# Altium PCB SnakeCard_Native.PcbDoc (part 2 of 2)
Units mm, origin at the board's own origin, x right, y up, seen from the top; angles counter-clockwise.
Board outline 85.6 x 54 mm, 2 copper layers (F.Cu, B.Cu), stack 0.8 mm thick; 136 components, 39 nets, 370 pads, 189 vias.
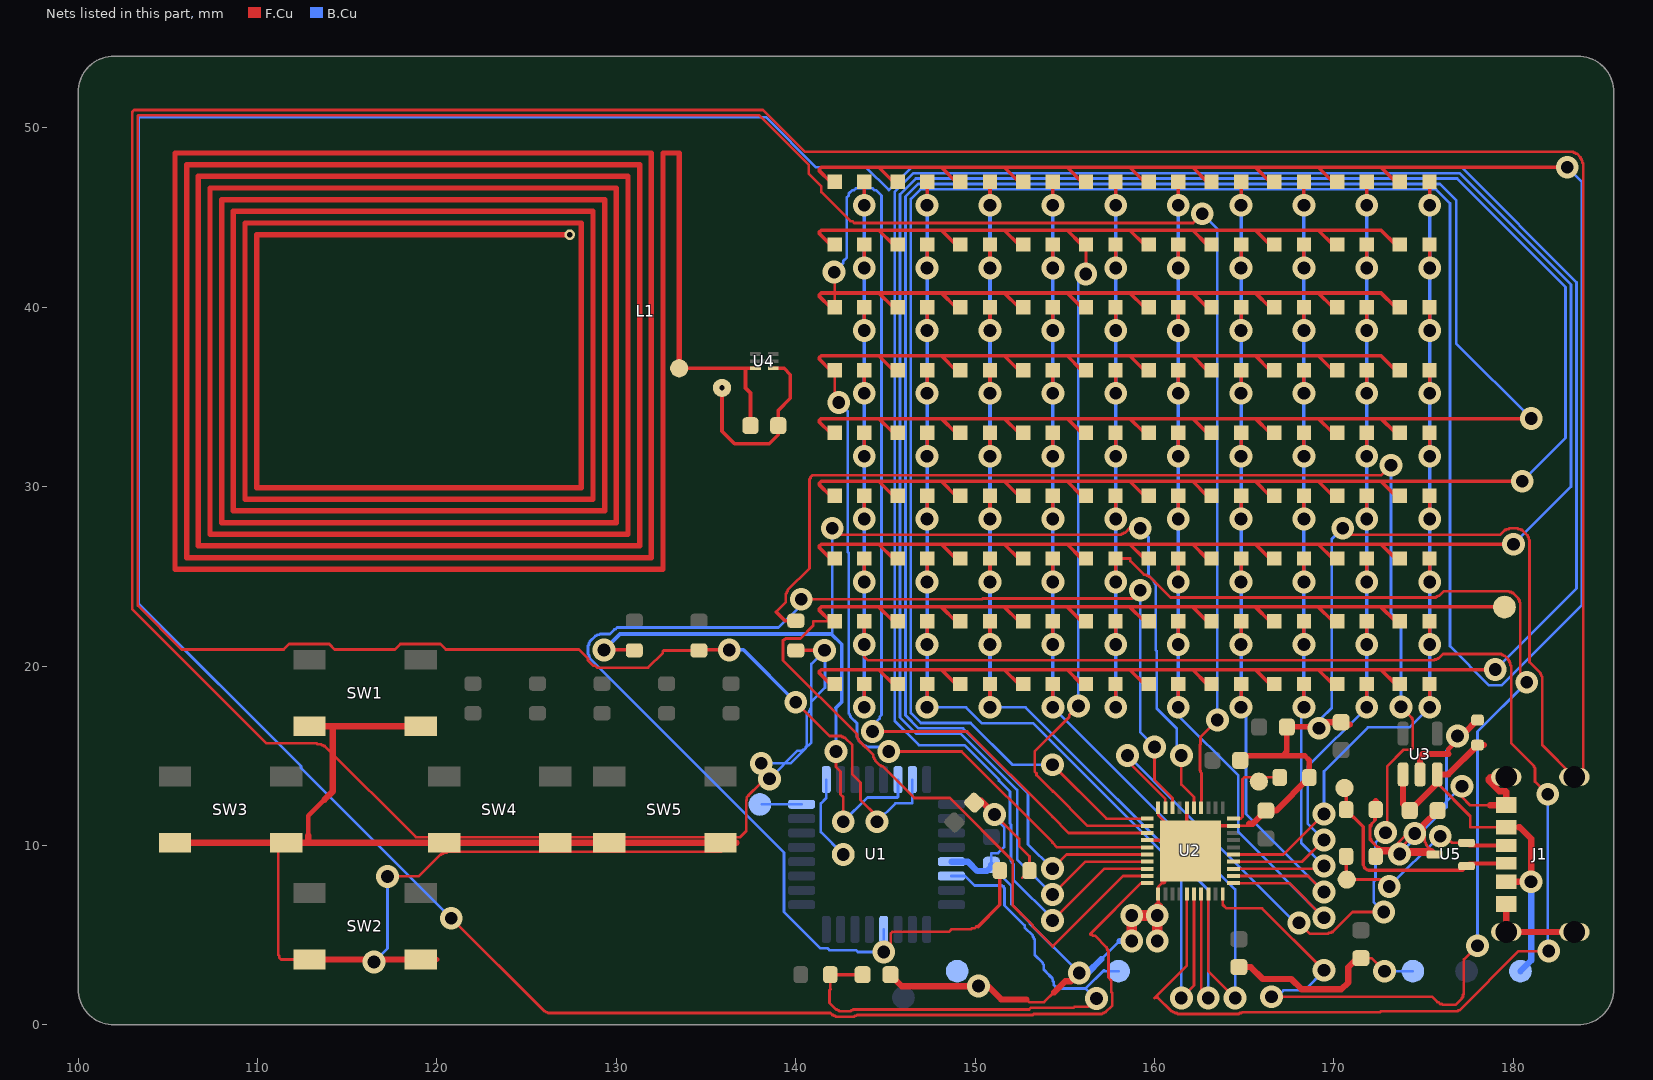
[diagram p2: the nets of this part, all layers, seen from the top]

## Via types
v1: diameter 1.27, hole 0.711, F.Cu to B.Cu, 189 vias

## Nets (pads, with @x,y where several pads share a name; then routed paths per layer and width w, separated by ;. In a path a pad name is that pad's centre, name@x,y a point inside that pad or via, vN(x,y) a via of type N, cw(c..) or ccw(c..) an arc to the next point about the centre after c; other vN are vias at no path point) (continued)
GND: C1.2 C2.2 C10.2 C11.2 C12.2 C20.2 C21.2 C22.2 C23.2 C24.2 D91.2 J1.A12 J1.B12 J1.S1 J1.S2 J1.S3 J1.S4 R1.2 R2.2 R22.2 R23.2 R24.2 SW1.2 SW2.2 SW3.2 SW4.2 SW5.2 TP3.1 TP5.1 U1.5 U2.4 U2.11 U2.29 U2.36 U2.40 U2.41 U3.2 U5.3 | length 459.1
  F.Cu w0.15: SW3.2@111.15,10.15 111.14,10.15 111.15,10.16 111.15,3.912 111.201,3.861 111.201,3.759 111.303,3.658 111.31,3.65 SW2.2@112.9,3.65 ; v1(116.484,3.505) 116.629,3.65 v1@116.62,3.65 ; v1(117.246,8.28) 118.974,8.28 120.193,9.5 120.244,9.5 120.294,9.55 120.345,9.55 120.396,9.601 120.548,9.601 120.599,9.652 SW5.2@135.839,9.652 ; v1(138.532,13.716) 138.532,13.513 138.481,13.513 138.43,13.462 138.354,13.462 138.328,13.437 137.998,13.437 137.363,12.802 137.363,12.776 137.262,12.675 137.262,12.522 137.236,12.497 137.236,10.795 136.906,10.465 118.821,10.465 113.741,15.545 113.69,15.545 113.64,15.596 113.589,15.596 113.538,15.646 113.335,15.646 113.284,15.697 110.49,15.697 103.022,23.165 103.022,50.902 103.124,51.003 138.176,51.003 140.513,48.666 183.337,48.666 183.388,48.616 183.439,48.616 183.49,48.565 183.54,48.565 183.744,48.362 183.744,48.311 183.794,48.26 183.794,48.209 183.845,48.158 183.845,48.057 183.896,48.006 183.896,14.326 J1.S4@183.388,13.818 ; v1(151.079,11.735) 152.451,10.363 152.451,9.982 153.035,9.398 153.025,9.388 R22.2@153.025,8.6 152.62,8.195 ; 152.857,1.422 153.01,1.27 153.848,1.27 154.407,1.829 ; U2.11@160.2,7.293 160.2,7.7 160.5,8 ; U2.40@160.2,12.108 160.2,11.7 160.5,11.4 160.7,11.2 U2.41@161.8,11.2 ; U2.41@162.762,11.043 U2.41@163.443,11.043 ; U2.41@163.5,11.043 U2.41@163.5,11.1 ; U2.29@164.408,11.1 165.16,11.1 165.277,11.218 ; v1(170.485,27.686) 170.84,27.33 179.273,27.33 179.527,27.584 179.578,27.584 179.629,27.635 179.73,27.635 179.781,27.686 180.238,27.686 180.289,27.635 180.391,27.635 180.442,27.584 180.492,27.584 180.797,27.28 180.797,27.229 180.848,27.178 180.848,27.076 180.899,27.026 180.899,20.218 181.508,19.609 181.508,19.558 181.559,19.507 181.559,19.456 181.61,19.406 181.61,15.596 J1.S4@183.388,13.818 ; C23.2@171.5,3.725 172.043,3.725 172.06,3.708 172.11,3.708 v1(172.822,2.997) ; R1.2@172.325,11.778 172.321,11.778 172.314,11.786 172.263,11.735 172.263,11.379 172.11,11.227 172.11,11.176 172.06,11.125 172.06,11.074 172.009,11.024 172.009,10.312 172.364,9.957 172.415,9.957 172.466,9.906 172.517,9.906 172.568,9.855 173.228,9.855 v1@173.33,9.957 ; R1.2@172.325,12 172.325,11.441 172.314,11.43 172.009,11.125 172.009,10.414 172.06,10.363 172.06,10.312 172.11,10.262 172.11,10.211 172.466,9.855 173.177,9.855 173.228,9.906 173.279,9.906 v1@173.33,9.957 ; v1(173.66,9.525) 173.634,9.5 U5.3@175.613,9.5 ; v1(174.498,10.668) 173.787,9.957 v1@173.33,9.957 ; 174.972,11.147 174.977,11.147 174.955,11.125 ; U5.3@175.436,9.676 175.412,9.652 175.412,9.703 175.362,9.754 175.362,9.804 175.158,10.008 175.158,10.058 175.108,10.109 175.108,10.16 175.057,10.211 175.057,10.922 174.955,11.024 174.955,11.125 ; v1(176.886,16.104) 176.987,16.205 177.241,16.205 177.221,16.226 v1@177.226,16.226 ; v1(177.14,13.31) 177.14,12.7 177.597,12.243 177.604,12.25 178.693,12.25 J1.A12@179.595,12.25 ; J1.S4@183.4,13.82 183.39,13.82 J1.S4@183.388,13.818 ; v1@173.33,9.957 173.38,9.957 174.498,11.074 174.549,11.074 174.6,11.125 174.955,11.125
  F.Cu w0.2: R23.2@140.004,20.879 v1(141.605,20.879) ; U2.4@159.593,10.3 U2.41@160.5,10.3 ; v1@160.2,6.55 U2.11@160.2,7.293 ; U2.41@161.8,11.2 U2.36@161.8,12.108 ; U2.41@163.5,11.1 U2.29@164.408,11.1
  F.Cu w0.262: 112.825,10.562 112.825,11.65 113.729,12.554 ; SW2.2@119.1,3.65 120,3.65 ; 176.376,15.1 176.376,15.376 v1@177.226,16.226
  F.Cu w0.3: C20.2@164.775,14.75 164.775,14.877 164.902,15.004 167.121,15.004 ; R24.2@168.625,13.8 168.625,14.75 168.371,15.004 167.121,15.004 ; v1(169.164,16.535) 169.088,16.612 167.481,16.612 167.375,16.506 167.375,16.4 167.375,15.258 167.121,15.004
  F.Cu w0.35: SW3.2@105.4,10.15 136.7,10.15 ; 112.825,10.15 112.825,10.562 ; SW2.2@112.9,3.65 SW2.2@119.1,3.65 ; SW1.2@112.9,16.65 SW1.2@119.1,16.65 ; 113.729,12.554 114.188,13.013 114.188,16.589 114.127,16.65 ; C12.2@145.275,2.8 145.911,2.164 v1(150.185,2.164) 150.19,2.159 150.368,2.159 150.393,2.134 150.749,2.134 151.46,1.422 152.857,1.422 ; C11.2@149.946,12.389 150.096,12.539 150.275,12.539 v1(151.079,11.735) ; 154.407,1.829 155.016,2.438 155.346,2.438 v1(155.804,2.896) ; 160.5,8 160.5,8.2 U2.41@162,9.7 161.8,9.9 U2.41@161.8,11.2 ; U2.41@160.5,10.3 U2.41@161.8,10.3 ; U2.41@161.8,11.043 U2.41@162.762,11.043 ; U2.41@163.443,11.043 U2.41@163.5,11.043 ; C22.2@164.7,3.225 165.354,3.225 166.019,2.56 167.615,2.56 168.194,1.981 170.409,1.981 170.79,2.362 170.79,3.217 171.298,3.725 C23.2@171.5,3.725 ; 165.277,11.218 165.468,11.218 C21.2@166.2,11.95 166.775,11.95 R24.2@168.625,13.8 ; C24.2@167.375,16.4 C24.2@167.375,16.6 ; v1(169.164,16.535) 169.189,16.535 169.529,16.875 C2.2@170.4,16.875 ; C2.2@170.218,16.693 C2.2@170.4,16.875 ; 170.875,16.741 170.534,16.741 C2.2@170.4,16.875 ; R2.2@172.325,9.4 172.6,9.676 175.437,9.676 U5.3@175.613,9.5 ; R1.2@172.325,11.778 172.325,12.475 ; U3.2@174.8,13.962 174.8,14.951 174.949,15.1 176.376,15.1 ; 174.972,11.147 C1.2@175.775,11.95 ; v1@177.226,16.226 D91.2@178,17 ; 178.693,12.25 J1.A12@179.595,12.25 179.595,13.001 179.57,13.027 179.217,13.027 178.623,13.62 178.623,13.72 178.723,13.82 J1.S2@179.6,13.82 ; J1.S1@179.595,5.185 J1.B12@179.595,6.75 ; J1.S1@179.6,5.18 J1.S3@183.4,5.18
  F.Cu w0.6: v1(158.725,4.674) v1(158.725,6.096) v1(160.147,6.096) ; v1(160.147,4.674) v1(160.147,6.096) ; v1@160.2,6.55 160.2,6.149 v1(160.147,6.096)
  B.Cu w0.15: v1(116.484,3.505) 117.246,4.267 v1(117.246,8.28) ; v1(138.074,14.58) 139.7,14.58 140.564,15.443 140.564,15.494 140.614,15.545 140.614,17.323 140.767,17.475 140.767,17.526 140.818,17.577 140.818,17.628 140.868,17.678 140.868,20.117 v1@141.63,20.879 ; v1(138.532,13.716) 140.106,15.291 140.36,15.291 140.411,15.342 140.462,15.342 140.868,15.748 140.868,18.034 141.63,18.796 v1@141.63,20.879 ; v1(141.605,20.879) v1@141.63,20.879 ; C10.2@150.9,8.825 150.89,8.825 150.901,8.814 150.952,8.814 152.019,7.747 152.019,6.731 153.035,5.715 153.035,5.69 153.06,5.664 153.06,5.639 v1(155.804,2.896) ; C10.2@150.9,8.925 150.9,9.574 150.901,9.576 151.282,9.576 151.613,9.906 151.613,11.024 151.587,11.049 151.587,11.074 151.079,11.582 v1(151.079,11.735) ; 157.023,3.658 158.039,4.674 ; v1(169.164,16.535) 169.266,16.637 169.266,17.069 169.875,17.678 169.875,27.076 v1(170.485,27.686) ; v1(172.822,2.997) TP3.1@174.396,2.997 ; v1(173.66,9.525) 176.276,12.141 176.276,15.291 176.886,15.9 v1(176.886,16.104) ; v1(174.498,10.668) v1(177.14,13.31)
  B.Cu w0.35: U1.5@148.675,9.1 149.6,9.1 150.125,8.575 150.65,8.575 150.9,8.825 C10.2@150.9,8.925 ; v1(155.804,2.896) 156.261,2.896 157.023,3.658 ; 158.039,4.674 v1(158.725,4.674)
I2C_SCL: R20.2 U1.30 U2.35 | length 70.6
  F.Cu w0.15: v1(142.037,27.686) 142.392,27.33 158.14,27.33 158.191,27.381 158.242,27.381 158.293,27.432 158.344,27.432 158.598,27.686 v1(159.207,27.686) ; v1(142.24,15.24) 142.24,14.376 142.494,14.122 142.494,12.852 142.646,12.7 v1(142.646,11.328) ; v1(161.493,15.011) 161.493,13.407 162.2,12.7 U2.35@162.2,12.108
  F.Cu w0.2: v1(129.311,20.904) 130.971,20.904 R20.2@131,20.875
  B.Cu w0.15: 141.981,21.791 141.984,21.791 142.037,21.844 v1(142.037,27.686) ; v1(142.24,15.24) 142.24,17.678 ; v1(142.646,11.328) 143.998,12.68 145.675,12.68 145.7,12.705 U1.30@145.7,13.675 ; v1(159.207,27.686) 159.207,27.635 159.664,27.178 159.664,25.044 159.969,24.74 159.969,24.689 160.02,24.638 160.02,24.587 160.071,24.536 160.071,20.879 160.122,20.828 160.122,17.628 161.239,16.51 161.239,15.291 161.493,15.037 161.468,15.011 v1(161.493,15.011)
  B.Cu w0.2: v1(129.311,20.904) 130.198,21.791 141.981,21.791 142.558,21.214 142.558,17.996 142.24,17.678
I2C_SDA: R21.2 U1.31 U2.34 | length 177
  F.Cu w0.15: R21.2@134.6,20.875 132.635,20.875 132.588,20.828 132.588,20.726 131.775,19.914 128.93,19.914 128.829,20.015 128.727,20.015 128.422,20.32 128.422,20.422 127.914,20.93 120.498,20.93 120.193,21.234 117.958,21.234 117.653,20.93 114.3,20.93 113.995,21.234 111.76,21.234 111.455,20.93 105.766,20.93 103.327,23.368 103.327,50.673 103.353,50.698 137.973,50.698 140.716,47.955 140.716,47.447 141.427,46.736 141.427,46.431 143.053,44.806 143.154,44.806 143.256,44.704 162.154,44.704 v1(162.662,45.212) ; v1(140.005,17.983) 141.884,16.104 142.545,16.104 142.596,16.053 142.646,16.053 142.697,16.002 142.748,16.002 143.154,15.596 143.154,13.97 143.612,13.513 143.612,12.548 144.526,11.633 v1(144.526,11.328) ; U2.34@162.6,12.108 162.6,12.75 ; 162.599,12.536 162.611,12.548 162.611,14.046 162.56,14.097 162.56,14.173 162.535,14.199 162.535,15.621 162.56,15.646 162.56,16.053 v1(163.5,16.993)
  F.Cu w0.2: R21.2@134.6,20.875 134.629,20.904 v1(136.296,20.904)
  B.Cu w0.15: v1(144.526,11.328) 145.548,12.35 146.475,12.35 146.5,12.375 U1.31@146.5,13.675 ; v1(162.662,45.212) 163.5,44.374 v1(163.5,16.993)
  B.Cu w0.2: v1(136.296,20.904) 137.084,20.904 v1(140.005,17.983)
LED_COL1: D1.2 D11.2 D21.2 D31.2 D41.2 D51.2 D61.2 D71.2 D81.2 U2.15 | length 125.5
  F.Cu w0.15: D71.2@143.825,22.5 143.825,20.533 143.815,20.523 144.018,20.32 175.565,20.32 175.616,20.371 175.717,20.371 175.768,20.422 175.819,20.422 176.073,20.676 179.324,20.676 179.375,20.625 179.426,20.625 179.476,20.574 179.527,20.574 179.73,20.371 179.73,20.32 179.781,20.269 179.781,20.218 179.832,20.168 179.832,20.066 179.883,20.015 179.883,15.697 181.153,14.427 181.153,14.376 181.204,14.326 181.204,13.564 v1(181.915,12.852) ; U2.15@161.8,7.293 161.8,3.304 159.995,1.499 160.02,1.524 160.172,1.524 160.934,0.762 160.985,0.762 161.036,0.711 161.087,0.711 161.138,0.66 161.239,0.66 161.29,0.61 164.694,0.61 164.744,0.66 164.846,0.66 164.897,0.711 172.568,0.711 172.618,0.762 176.886,0.762 176.936,0.813 176.987,0.813 180.289,4.115 v1(181.966,4.115)
  F.Cu w0.2: v1(143.815,17.704) 143.815,18.99 D81.2@143.825,19 ; v1(143.815,21.209) 143.815,22.49 D71.2@143.825,22.5 ; v1(143.815,24.689) 143.815,25.99 D61.2@143.825,26 ; v1(143.815,28.194) 143.815,29.49 D51.2@143.825,29.5 ; v1(143.815,31.699) 143.815,32.99 D41.2@143.825,33 ; v1(143.815,35.204) 143.815,36.49 D31.2@143.825,36.5 ; v1(143.815,38.71) 143.815,39.99 D21.2@143.825,40 ; v1(143.815,42.189) 143.815,43.49 D11.2@143.825,43.5 ; v1(143.815,45.695) 143.815,46.99 D1.2@143.825,47
  B.Cu w0.15: v1(181.915,12.852) 181.915,4.166 v1(181.966,4.115)
  B.Cu w0.2: v1(143.815,17.704) v1(143.815,45.695)
LED_COL2: D2.2 D12.2 D22.2 D32.2 D42.2 D52.2 D62.2 D72.2 D82.2 U2.16 | length 70.8
  F.Cu w0.15: v1(161.493,1.499) 162.2,2.205 U2.16@162.2,7.293
  F.Cu w0.2: v1(147.32,17.704) D82.2@147.32,18.995 ; v1(147.32,21.209) D72.2@147.32,22.495 ; v1(147.32,24.689) D62.2@147.32,25.995 ; v1(147.32,28.194) D52.2@147.32,29.495 ; v1(147.32,31.699) D42.2@147.32,32.995 ; v1(147.32,35.204) D32.2@147.32,36.495 ; v1(147.32,38.71) D22.2@147.32,39.995 ; v1(147.32,42.189) D12.2@147.32,43.495 ; v1(147.32,45.695) D2.2@147.32,46.995
  B.Cu w0.15: v1(147.32,17.704) 149.489,17.704 150.384,16.809 153.243,16.809 161.493,8.559 v1(161.493,1.499)
  B.Cu w0.2: v1(147.32,17.704) v1(147.32,45.695)
LED_COL3: D3.2 D13.2 D23.2 D33.2 D43.2 D53.2 D63.2 D73.2 D83.2 U2.17 | length 68.1
  F.Cu w0.15: U2.17@162.6,7.293 162.6,1.89 v1(162.992,1.499)
  F.Cu w0.2: v1(150.825,17.704) D83.2@150.825,19 ; v1(150.825,21.209) D73.2@150.825,22.5 ; v1(150.825,24.689) D63.2@150.825,26 ; v1(150.825,28.194) D53.2@150.825,29.5 ; v1(150.825,31.699) D43.2@150.825,33 ; v1(150.825,35.204) D33.2@150.825,36.5 ; v1(150.825,38.71) D23.2@150.825,40 ; v1(150.825,42.189) D13.2@150.825,43.5 ; v1(150.825,45.695) D3.2@150.825,47
  B.Cu w0.15: v1(150.825,17.704) 152.812,17.704 162.992,7.524 v1(162.992,1.499)
  B.Cu w0.2: v1(150.825,17.704) v1(150.825,45.695)
LED_COL4: D4.2 D14.2 D24.2 D34.2 D44.2 D54.2 D64.2 D74.2 D84.2 U2.18 | length 66.5
  F.Cu w0.15: U2.18@163,7.293 163,2.989 v1(164.49,1.499)
  F.Cu w0.2: v1(154.33,17.704) D84.2@154.33,18.995 ; v1(154.33,21.209) D74.2@154.33,22.495 ; v1(154.33,24.689) D64.2@154.33,25.995 ; v1(154.33,28.194) D54.2@154.33,29.495 ; v1(154.33,31.699) D44.2@154.33,32.995 ; v1(154.33,35.204) D34.2@154.33,36.495 ; v1(154.33,38.71) D24.2@154.33,39.995 ; v1(154.33,42.189) D14.2@154.33,43.495 ; v1(154.33,45.695) D4.2@154.33,46.995
  B.Cu w0.15: v1(154.33,17.704) 164.49,7.544 v1(164.49,1.499)
  B.Cu w0.2: v1(154.33,17.704) v1(154.33,45.695)
LED_COL5: D5.2 D15.2 D25.2 D35.2 D45.2 D55.2 D65.2 D75.2 D85.2 U2.20 | length 109.8
  F.Cu w0.15: D65.2@157.825,26 158.639,26 158.648,26.01 158.648,25.857 159.41,25.095 159.512,25.095 159.563,25.044 159.614,25.044 159.664,24.994 159.715,24.994 160.884,23.825 175.666,23.825 175.717,23.876 175.768,23.876 175.819,23.927 175.87,23.927 176.124,24.181 179.73,24.181 179.781,24.13 179.883,24.13 179.934,24.079 179.984,24.079 180.289,23.774 180.289,23.724 180.34,23.673 180.34,23.571 180.391,23.52 180.391,19.456 v1(180.746,19.101) ; U2.20@163.8,7.293 163.8,6.7 164,6.5 165.991,6.5 v1(169.443,3.048) ; v1(166.522,1.575) 175.463,1.575 175.768,1.27 175.819,1.27 175.92,1.168 176.022,1.168 176.073,1.118 176.784,1.118 177.14,1.473 177.14,1.524 177.19,1.575 177.19,1.676 177.241,1.727 177.241,3.658 v1(178.003,4.42)
  F.Cu w0.2: D85.2@157.825,19 157.836,18.989 v1(157.836,17.704) ; D75.2@157.825,22.5 157.836,22.489 v1(157.836,21.209) ; D65.2@157.825,26 157.836,25.989 v1(157.836,24.689) ; D55.2@157.825,29.5 157.836,29.489 v1(157.836,28.194) ; D45.2@157.825,33 157.836,32.989 v1(157.836,31.699) ; D35.2@157.825,36.5 157.836,36.489 v1(157.836,35.204) ; D25.2@157.825,40 157.836,39.989 v1(157.836,38.71) ; D15.2@157.825,43.5 157.836,43.489 v1(157.836,42.189) ; D5.2@157.825,47 157.836,46.989 v1(157.836,45.695)
  B.Cu w0.15: v1(166.522,1.575) 166.573,1.626 166.878,1.626 167.183,1.93 168.351,1.93 169.469,3.048 v1(169.443,3.048) ; v1(178.003,4.42) 178.003,16.358 v1(180.746,19.101)
  B.Cu w0.2: v1(157.836,17.704) v1(157.836,45.695)
LED_COL6: D6.2 D16.2 D26.2 D36.2 D46.2 D56.2 D66.2 D76.2 D86.2 U2.21 | length 60.7
  F.Cu w0.15: U2.21@164.408,7.9 167.512,7.9 v1(169.443,5.969)
  F.Cu w0.2: v1(161.315,17.704) 161.315,18.99 D86.2@161.325,19 ; v1(161.315,21.209) 161.315,22.49 D76.2@161.325,22.5 ; v1(161.315,24.689) 161.315,25.99 D66.2@161.325,26 ; v1(161.315,28.194) 161.315,29.49 D56.2@161.325,29.5 ; v1(161.315,31.699) 161.315,32.99 D46.2@161.325,33 ; v1(161.315,35.204) 161.315,36.49 D36.2@161.325,36.5 ; v1(161.315,38.71) 161.315,39.99 D26.2@161.325,40 ; v1(161.315,42.189) 161.315,43.49 D16.2@161.325,43.5 ; v1(161.315,45.695) 161.315,46.99 D6.2@161.325,47
  B.Cu w0.15: v1(161.315,17.704) 161.315,17.247 164.671,13.892 164.671,10.742 v1(169.443,5.969)
  B.Cu w0.2: v1(161.315,17.704) v1(161.315,45.695)
LED_COL7: D7.2 D17.2 D27.2 D37.2 D47.2 D57.2 D67.2 D77.2 D87.2 U2.22 | length 57.3
  F.Cu w0.15: U2.22@164.408,8.3 168.56,8.3 v1(169.443,7.417)
  F.Cu w0.2: v1(164.821,17.704) D87.2@164.821,18.996 ; v1(164.821,21.209) D77.2@164.821,22.496 ; v1(164.821,24.689) D67.2@164.821,25.996 ; v1(164.821,28.194) D57.2@164.821,29.496 ; v1(164.821,31.699) D47.2@164.821,32.996 ; v1(164.821,35.204) D37.2@164.821,36.496 ; v1(164.821,38.71) D27.2@164.821,39.996 ; v1(164.821,42.189) D17.2@164.821,43.496 ; v1(164.821,45.695) D7.2@164.821,46.996
  B.Cu w0.15: v1(164.821,17.704) 165.097,17.427 165.097,11.763 v1(169.443,7.417)
  B.Cu w0.2: v1(164.821,17.704) v1(164.821,45.695)
LED_COL8: D8.2 D18.2 D28.2 D38.2 D48.2 D58.2 D68.2 D78.2 D88.2 U2.23 | length 54.2
  F.Cu w0.15: U2.23@164.408,8.7 169.279,8.7 v1(169.443,8.865)
  F.Cu w0.2: v1(168.326,17.704) D88.2@168.325,19 ; v1(168.326,21.209) D78.2@168.325,22.5 ; v1(168.326,24.689) D68.2@168.325,26 ; v1(168.326,28.194) D58.2@168.325,29.5 ; v1(168.326,31.699) D48.2@168.325,33 ; v1(168.326,35.204) D38.2@168.325,36.5 ; v1(168.326,38.71) D28.2@168.325,40 ; v1(168.326,42.189) D18.2@168.325,43.5 ; v1(168.326,45.695) D8.2@168.325,47
  B.Cu w0.15: v1(168.326,17.704) 168.175,17.553 168.175,10.133 v1(169.443,8.865)
  B.Cu w0.2: v1(168.326,17.704) v1(168.326,45.695)
LED_COL9: D9.2 D19.2 D29.2 D39.2 D49.2 D59.2 D69.2 D79.2 D89.2 U2.24 | length 54.3
  F.Cu w0.15: U2.24@164.408,9.1 168.231,9.1 v1(169.443,10.312)
  F.Cu w0.2: v1(171.831,17.704) D89.2@171.831,18.994 ; v1(171.831,21.209) D79.2@171.831,22.494 ; v1(171.831,24.689) D69.2@171.831,25.994 ; v1(171.831,28.194) D59.2@171.831,29.494 ; v1(171.831,31.699) D49.2@171.831,32.994 ; v1(171.831,35.204) D39.2@171.831,36.494 ; v1(171.831,38.71) D29.2@171.831,39.994 ; v1(171.831,42.189) D19.2@171.831,43.494 ; v1(171.831,45.695) D9.2@171.831,46.994
  B.Cu w0.15: v1(169.443,10.312) 168.536,11.22 168.536,14.409 v1(171.831,17.704)
  B.Cu w0.2: v1(171.831,17.704) v1(171.831,45.695)
LED_COL10: D10.2 D20.2 D30.2 D40.2 D50.2 D60.2 D70.2 D80.2 D90.2 U2.25 | length 55.5
  F.Cu w0.15: U2.25@164.408,9.5 167.183,9.5 v1(169.443,11.76)
  F.Cu w0.2: D90.2@175.325,19 175.336,18.989 v1(175.336,17.704) ; D80.2@175.325,22.5 175.336,22.489 v1(175.336,21.209) ; D70.2@175.325,26 175.336,25.989 v1(175.336,24.689) ; D60.2@175.325,29.5 175.336,29.489 v1(175.336,28.194) ; D50.2@175.325,33 175.336,32.989 v1(175.336,31.699) ; D40.2@175.325,36.5 175.336,36.489 v1(175.336,35.204) ; D30.2@175.325,40 175.336,39.989 v1(175.336,38.71) ; D20.2@175.325,43.5 175.336,43.489 v1(175.336,42.189) ; D10.2@175.325,47 175.336,46.989 v1(175.336,45.695)
  B.Cu w0.15: v1(169.443,11.76) 169.443,14.133 171.895,16.585 174.218,16.585 v1(175.336,17.704)
  B.Cu w0.2: v1(175.336,17.704) v1(175.336,45.695)
LED_EN: R22.1 U1.12 U2.38 | length 83.6
  F.Cu w0.15: v1(140.31,23.724) 150.368,23.724 150.419,23.774 158.75,23.774 v1(159.207,24.232) ; v1(144.907,4.064) 145.3,4.457 145.3,5.1 145.4,5.2 148.558,5.2 148.692,5.334 149.758,5.334 149.809,5.385 149.962,5.385 150.063,5.486 150.165,5.486 ; v1(159.995,15.494) 159.995,13.655 161,12.65 U2.38@161,12.108
  F.Cu w0.2: 150.165,5.486 151.375,6.697 R22.1@151.375,8.6
  B.Cu w0.15: v1(140.31,23.724) 140.31,23.419 139.04,22.149 130.048,22.149 129.946,22.047 129.896,22.047 129.642,21.793 129.083,21.793 129.032,21.742 128.93,21.742 128.88,21.692 128.829,21.692 128.524,21.387 128.524,21.336 128.473,21.285 128.473,21.184 128.422,21.133 128.422,20.676 128.473,20.625 128.473,20.523 128.524,20.472 128.524,20.422 139.344,9.601 139.344,6.299 141.376,4.267 141.783,4.267 141.884,4.166 143.358,4.166 143.459,4.064 v1@144.882,4.064 ; v1@144.882,4.115 v1@145.034,4.267 ; v1@144.889,4.071 144.9,4.071 U1.12@144.9,5.325 v1@144.9,4.133 ; v1(159.207,24.232) 159.207,16.307 160.02,15.494 v1(159.995,15.494)
LED_IICRST: R23.1 U2.39 | length 91.8
  F.Cu w0.15: 138.913,23.012 138.887,23.012 139.446,23.571 139.446,24.028 139.497,24.079 139.497,24.13 139.548,24.181 139.548,24.232 140.767,25.451 140.767,30.429 140.818,30.48 140.818,30.531 140.919,30.632 172.618,30.632 v1(173.177,31.191) ; v1(158.496,15.011) 158.496,14.704 160.6,12.6 U2.39@160.6,12.108 ; v1(168.046,5.69) 168.656,5.08 169.672,5.08 169.723,5.131 169.824,5.131 169.875,5.182 169.926,5.182 171.044,6.299 v1(172.771,6.299) ; v1(172.872,10.719) 172.872,11.278 172.974,11.379 172.974,14.427 173.888,15.342 174.295,15.342 174.396,15.443 174.396,17.018 174.346,17.069 174.346,17.12 v1(173.736,17.729)
  F.Cu w0.2: 138.913,23.012 139.4,22.525 R23.1@140,22.525
  B.Cu w0.15: v1(158.496,15.011) 158.471,15.011 158.496,15.037 167.843,5.69 v1(168.046,5.69) ; v1(172.771,6.299) 172.212,6.858 172.212,8.026 172.263,8.026 172.263,8.128 172.314,8.128 172.314,10.16 v1(172.872,10.719) ; v1(173.177,31.191) 173.177,22.962 173.736,22.403 v1(173.736,17.729)
LED_R_EXT: pad.RN01 R24.1 U2.30 | length 5
  F.Cu w0.15: U2.30@164.408,11.5 164.8,11.5 164.9,11.6 164.9,13.7 165,13.8 R24.1@166.975,13.8 ; pad.RN01@165.811,13.564 pad.RN01@165.811,13.8
LED_ROW1: D1.1 D2.1 D3.1 D4.1 D5.1 D6.1 D7.1 D8.1 D9.1 D10.1 U2.1 | length 189.8
  F.Cu w0.15: v1(154.305,14.503) 157.308,11.5 U2.1@159.593,11.5
  F.Cu w0.2: D1.1@142.175,47 141.925,47 141.325,47.6 141.325,47.7 141.425,47.8 v1@183.004,47.8 ; 144.625,47.8 145.425,47 D2.1@145.675,47 ; 148.125,47.8 148.925,47 D3.1@149.175,47 ; 151.625,47.8 152.425,47 D4.1@152.675,47 ; 155.125,47.8 155.925,47 D5.1@156.175,47 ; 158.625,47.8 159.425,47 D6.1@159.675,47 ; 162.125,47.8 162.925,47 D7.1@163.175,47 ; 165.625,47.8 166.425,47 D8.1@166.675,47 ; 169.125,47.8 169.925,47 D9.1@170.175,47 ; 172.625,47.8 173.425,47 D10.1@173.675,47
  B.Cu w0.15: v1(154.305,14.503) 152.075,14.503 149.746,16.832 146.971,16.832 146.416,17.387 146.416,46.049 146.942,46.575 175.689,46.575 176.465,45.799 176.465,21.113 178.65,18.929 179.346,18.929 183.82,23.403 183.82,46.99 v1(183.007,47.803)
LED_ROW2: D11.1 D12.1 D13.1 D14.1 D15.1 D16.1 D17.1 D18.1 D19.1 D20.1 U2.2 | length 83.2
  F.Cu w0.15: 154.305,13.056 156.261,11.1 U2.2@159.593,11.1 ; 154.33,13.005 153.416,13.919 153.416,14.021 153.314,14.122 153.314,15.24 155.245,17.17 155.245,17.272 v1(155.753,17.78) ; v1(156.159,41.859) 156.175,41.875 D15.1@156.175,43.5
  F.Cu w0.2: D11.1@142.175,43.5 141.925,43.5 141.325,44.1 141.325,44.2 141.425,44.3 172.625,44.3 173.425,43.5 D20.1@173.675,43.5 ; 144.625,44.3 145.425,43.5 D12.1@145.675,43.5 ; 148.125,44.3 148.925,43.5 D13.1@149.175,43.5 ; 151.625,44.3 152.425,43.5 D14.1@152.675,43.5 ; 155.125,44.3 155.925,43.5 D15.1@156.175,43.5 ; 158.625,44.3 159.425,43.5 D16.1@159.675,43.5 ; 162.125,44.3 162.925,43.5 D17.1@163.175,43.5 ; 165.625,44.3 166.425,43.5 D18.1@166.675,43.5 ; 169.125,44.3 169.925,43.5 D19.1@170.175,43.5
  B.Cu w0.15: v1(155.753,17.78) 155.753,41.453 v1(156.159,41.859)
LED_ROW3: D21.1 D22.1 D23.1 D24.1 D25.1 D26.1 D27.1 D28.1 D29.1 D30.1 U2.3 | length 101.6
  F.Cu w0.15: v1(142.138,41.961) 142.175,41.924 D21.1@142.175,40 ; v1(144.272,16.358) 149.555,16.358 154.33,11.582 ; 154.305,11.608 155.213,10.7 U2.3@159.593,10.7
  F.Cu w0.2: D21.1@142.175,40 141.925,40 141.325,40.6 141.325,40.7 141.425,40.8 172.625,40.8 173.425,40 D30.1@173.675,40 ; 144.625,40.8 145.425,40 D22.1@145.675,40 ; 148.125,40.8 148.925,40 D23.1@149.175,40 ; 151.625,40.8 152.425,40 D24.1@152.675,40 ; 155.125,40.8 155.925,40 D25.1@156.175,40 ; 158.625,40.8 159.425,40 D26.1@159.675,40 ; 162.125,40.8 162.925,40 D27.1@163.175,40 ; 165.625,40.8 166.425,40 D28.1@166.675,40 ; 169.125,40.8 169.925,40 D29.1@170.175,40
  B.Cu w0.15: v1(142.138,41.961) 142.646,42.469 142.646,42.57 142.85,42.774 142.85,46.126 142.951,46.228 142.951,46.33 143.154,46.533 143.256,46.533 143.358,46.634 144.272,46.634 144.374,46.533 144.475,46.533 144.78,46.228 144.78,17.272 144.678,17.17 144.678,17.069 144.272,16.662 v1(144.272,16.358)
LED_ROW4: D31.1 D32.1 D33.1 D34.1 D35.1 D36.1 D37.1 D38.1 D39.1 D40.1 U2.5 | length 85.2
  F.Cu w0.15: D31.1@142.175,36.5 142.175,34.507 142.189,34.493 v1(142.392,34.696) ; v1(145.186,15.24) 149.25,15.24 154.33,10.16 154.305,10.16 154.565,9.9 U2.5@159.593,9.9
  F.Cu w0.2: D31.1@142.175,36.5 141.925,36.5 141.325,37.1 141.325,37.2 141.425,37.3 172.625,37.3 173.425,36.5 D40.1@173.675,36.5 ; 144.625,37.3 145.425,36.5 D32.1@145.675,36.5 ; 148.125,37.3 148.925,36.5 D33.1@149.175,36.5 ; 151.625,37.3 152.425,36.5 D34.1@152.675,36.5 ; 155.125,37.3 155.925,36.5 D35.1@156.175,36.5 ; 158.625,37.3 159.425,36.5 D36.1@159.675,36.5 ; 162.125,37.3 162.925,36.5 D37.1@163.175,36.5 ; 165.625,37.3 166.425,36.5 D38.1@166.675,36.5 ; 169.125,37.3 169.925,36.5 D39.1@170.175,36.5
  B.Cu w0.15: v1(142.392,34.696) 142.9,34.188 142.9,26.365 142.951,26.314 142.951,17.374 143.002,17.323 143.002,17.272 143.053,17.221 143.053,17.17 143.408,16.815 143.408,16.053 143.459,16.002 143.459,15.951 143.51,15.9 143.51,15.85 143.764,15.596 143.815,15.596 143.866,15.545 143.916,15.545 143.967,15.494 144.932,15.494 v1(145.186,15.24)
LED_ROW5: D41.1 D42.1 D43.1 D44.1 D45.1 D46.1 D47.1 D48.1 D49.1 D50.1 U2.6 | length 146.5
  F.Cu w0.15: v1(154.305,8.712) 155.093,9.5 U2.6@159.593,9.5
  F.Cu w0.2: D41.1@142.175,33 141.925,33 141.325,33.6 141.325,33.7 141.425,33.8 180.993,33.8 v1(181,33.807) ; 144.625,33.8 145.425,33 D42.1@145.675,33 ; 148.125,33.8 148.925,33 D43.1@149.175,33 ; 151.625,33.8 152.425,33 D44.1@152.675,33 ; 155.125,33.8 155.925,33 D45.1@156.175,33 ; 158.625,33.8 159.425,33 D46.1@159.675,33 ; 162.125,33.8 162.925,33 D47.1@163.175,33 ; 165.625,33.8 166.425,33 D48.1@166.675,33 ; 169.125,33.8 169.925,33 D49.1@170.175,33 ; 172.625,33.8 173.425,33 D50.1@173.675,33
  B.Cu w0.15: v1(154.305,8.712) 152.948,10.069 152.948,12.911 149.329,16.531 146.846,16.531 146.114,17.262 146.114,46.174 146.817,46.877 175.91,46.877 176.813,45.975 176.813,37.995 v1(181,33.807)
LED_ROW6: D51.1 D52.1 D53.1 D54.1 D55.1 D56.1 D57.1 D58.1 D59.1 D60.1 U2.7 | length 154.7
  F.Cu w0.15: v1(154.305,7.264) 156.141,9.1 U2.7@159.593,9.1
  F.Cu w0.2: D51.1@142.175,29.5 141.925,29.5 141.325,30.1 141.325,30.2 141.425,30.3 v1@180.49,30.3 ; 144.625,30.3 145.425,29.5 D52.1@145.675,29.5 ; 148.125,30.3 148.925,29.5 D53.1@149.175,29.5 ; 151.625,30.3 152.425,29.5 D54.1@152.675,29.5 ; 155.125,30.3 155.925,29.5 D55.1@156.175,29.5 ; 158.625,30.3 159.425,29.5 D56.1@159.675,29.5 ; 162.125,30.3 162.925,29.5 D57.1@163.175,29.5 ; 165.625,30.3 166.425,29.5 D58.1@166.675,29.5 ; 169.125,30.3 169.925,29.5 D59.1@170.175,29.5 ; 172.625,30.3 173.425,29.5 D60.1@173.675,29.5
  B.Cu w0.15: v1(154.305,7.264) 152.339,9.231 152.339,13.094 149.204,16.229 146.721,16.229 145.813,17.137 145.813,46.299 146.692,47.179 176.864,47.179 182.905,41.137 182.905,32.715 v1(180.492,30.302)
LED_ROW7: D61.1 D62.1 D63.1 D64.1 D65.1 D66.1 D67.1 D68.1 D69.1 D70.1 U2.8 | length 161.2
  F.Cu w0.15: v1(154.305,5.817) 157.188,8.7 U2.8@159.593,8.7
  F.Cu w0.2: D61.1@142.175,26 141.925,26 141.325,26.6 141.325,26.7 141.425,26.8 v1@180.007,26.8 ; 144.625,26.8 145.425,26 D62.1@145.675,26 ; 148.125,26.8 148.925,26 D63.1@149.175,26 ; 151.625,26.8 152.425,26 D64.1@152.675,26 ; 155.125,26.8 155.925,26 D65.1@156.175,26 ; 158.625,26.8 159.425,26 D66.1@159.675,26 ; 162.125,26.8 162.925,26 D67.1@163.175,26 ; 165.625,26.8 166.425,26 D68.1@166.675,26 ; 169.125,26.8 169.925,26 D69.1@170.175,26 ; 172.625,26.8 173.425,26 D70.1@173.675,26
  B.Cu w0.15: 151.345,13.653 149.403,15.595 146.87,15.595 145.511,16.954 145.511,46.424 146.567,47.48 177.006,47.48 183.217,41.27 183.217,30.004 v1(180.01,26.797) ; 151.345,13.653 151.333,13.665 151.333,13.614 151.943,13.005 151.943,11.227 151.994,11.176 151.994,9.144 152.044,9.093 152.044,9.042 152.146,8.941 152.146,8.077 154.33,5.893 154.33,5.791 v1(154.305,5.817)
LED_ROW8: D71.1 D72.1 D73.1 D74.1 D75.1 D76.1 D77.1 D78.1 D79.1 D80.1 pad.RN04 U2.9 | length 86.8
  F.Cu w0.15: D71.1@142.175,22.5 140.974,22.5 140.97,22.504 140.97,22.25 140.259,21.539 139.446,21.539 139.395,21.488 139.344,21.488 139.294,21.438 139.294,20.32 143.408,16.205 143.408,16.053 143.459,16.002 143.459,15.951 143.51,15.9 143.51,15.85 144.323,15.037 144.323,14.935 144.374,14.884 144.374,14.834 144.424,14.783 144.424,14.732 144.678,14.478 144.729,14.478 144.78,14.427 144.831,14.427 146.609,12.649 148.59,12.649 152.095,9.144 152.095,6.655 153.213,5.537 153.213,5.486 154.33,4.369 154.305,4.369 158.236,8.3 U2.9@159.593,8.3
  F.Cu w0.2: D71.1@142.175,22.5 141.925,22.5 141.325,23.1 141.325,23.2 141.425,23.3 179.494,23.3 pad.RN04@179.502,23.292 ; 144.625,23.3 145.425,22.5 D72.1@145.675,22.5 ; 148.125,23.3 148.925,22.5 D73.1@149.175,22.5 ; 151.625,23.3 152.425,22.5 D74.1@152.675,22.5 ; 155.125,23.3 155.925,22.5 D75.1@156.175,22.5 ; 158.625,23.3 159.425,22.5 D76.1@159.675,22.5 ; 162.125,23.3 162.925,22.5 D77.1@163.175,22.5 ; 165.625,23.3 166.425,22.5 D78.1@166.675,22.5 ; 169.125,23.3 169.925,22.5 D79.1@170.175,22.5 ; 172.625,23.3 173.425,22.5 D80.1@173.675,22.5
LED_ROW9: D81.1 D82.1 D83.1 D84.1 D85.1 D86.1 D87.1 D88.1 D89.1 D90.1 U2.10 | length 260
  F.Cu w0.15: v1(120.802,5.944) 125.984,0.762 126.035,0.762 126.086,0.711 126.136,0.711 126.187,0.66 141.935,0.66 142.037,0.559 142.088,0.559 142.138,0.508 142.189,0.508 142.24,0.457 143.256,0.457 143.307,0.508 143.358,0.508 143.408,0.559 153.213,0.559 153.264,0.61 157.074,0.61 157.124,0.66 157.175,0.66 157.226,0.711 157.277,0.711 157.632,1.067 157.632,1.778 157.582,1.829 157.582,2.489 157.429,2.642 157.429,4.115 157.378,4.166 157.378,4.216 157.328,4.267 157.328,4.318 156.667,4.978 156.566,4.978 156.515,5.029 156.439,5.029 156.413,5.055 156.413,5.08 159.233,7.9 U2.10@159.593,7.9
  F.Cu w0.2: D81.1@142.175,19 141.925,19 141.325,19.6 141.325,19.7 141.425,19.8 178.982,19.8 v1(178.994,19.812) ; 144.625,19.8 145.425,19 D82.1@145.675,19 ; 148.125,19.8 148.925,19 D83.1@149.175,19 ; 151.625,19.8 152.425,19 D84.1@152.675,19 ; 155.125,19.8 155.925,19 D85.1@156.175,19 ; 158.625,19.8 159.425,19 D86.1@159.675,19 ; 162.125,19.8 162.925,19 D87.1@163.175,19 ; 165.625,19.8 166.425,19 D88.1@166.675,19 ; 169.125,19.8 169.925,19 D89.1@170.175,19 ; 172.625,19.8 173.425,19 D90.1@173.675,19
  B.Cu w0.15: v1(120.802,5.944) 112.42,14.326 112.42,14.427 103.378,23.47 103.378,50.546 103.429,50.597 138.328,50.597 141.122,47.803 143.916,47.803 145.186,46.533 145.203,46.549 145.209,46.549 146.442,47.782 177.131,47.782 183.518,41.395 183.518,24.337 v1(178.994,19.812)
NFC_AC0: C30.1 L1.1 U4.3 | length 7.6
  F.Cu w0.2: L1.1@133.502,36.601 133.504,36.6 U4.3@137.75,36.6 ; 137.2,36.6 137.2,35.5 137.475,35.225 C30.1@137.475,33.4
NFC_AC1: C30.2 L1.2 U4.4 | length 10.8
  F.Cu w0.2: L1.2@135.89,35.509 135.89,33.1 136.59,32.4 138.525,32.4 139.025,32.9 C30.2@139.025,33.4 139.025,34.25 139.7,34.925 139.7,36.25 139.35,36.6 U4.4@138.75,36.6
NRST: C12.1 R10.2 TP8.1 U1.6 | length 33.6
  F.Cu w0.15: R10.2@141.925,2.8 141.925,1.991 141.935,1.981 141.884,1.93 141.884,1.219 142.24,0.864 142.291,0.864 142.342,0.813 142.392,0.813 142.443,0.762 143.053,0.762 143.104,0.813 143.154,0.813 143.205,0.864 153.01,0.864 153.111,0.965 155.499,0.965 155.55,1.016 156.312,1.016 v1(156.769,1.473)
  F.Cu w0.2: R10.2@141.925,2.8 C12.1@143.725,2.8
  B.Cu w0.15: U1.6@148.675,8.3 149.434,8.3 149.962,7.772 151.486,7.772 151.536,7.722 151.587,7.722 151.587,7.671 151.638,7.62 151.638,6.655 152.756,5.537 152.756,5.436 153.213,4.978 153.213,4.928 153.264,4.877 153.264,4.826 153.314,4.775 153.314,3.912 153.772,3.454 153.772,3.404 153.822,3.353 153.822,3.099 154.127,2.794 154.127,2.743 154.178,2.743 154.178,2.692 154.229,2.692 154.28,2.642 154.28,2.591 154.33,2.54 154.33,2.438 154.381,2.388 154.381,2.235 154.483,2.134 154.737,2.134 154.838,2.032 156.159,2.032 ; v1(156.769,1.473) 156.718,1.473 156.159,2.032 ; TP8.1@157.988,2.997 157.226,2.997 157.175,3.048 156.159,2.032
SWCLK: TP7.1 U1.25 | length 4.8
  B.Cu w0.15: U1.25@141.7,13.675 141.7,12.65 141.4,12.35 141.4,10.746 v1(142.646,9.5)
SWDIO: TP6.1 U1.24 | length 2.2
  B.Cu w0.15: TP6.1@138.1,12.294 138.106,12.3 138.589,12.3 U1.24@140.325,12.3
USB_CC1: J1.A5 pad.RN02 R1.1 U5.1 | length 13.1
  F.Cu w0.15: 171.624,8.943 171.605,8.943 171.602,8.941 171.653,8.89 171.653,8.839 171.704,8.788 171.704,8.738 171.755,8.687 171.806,8.687 171.856,8.636 171.958,8.636 171.954,8.632 171.935,8.632
  F.Cu w0.2: pad.RN02@170.586,13.208 170.675,13.119 R1.1@170.675,12 171.624,11.051 171.624,8.943 ; 171.935,8.632 177.17,8.632 177.538,9 J1.A5@179.595,9
USB_CC2: J1.B5 pad.RN03 R2.1 U5.2 | length 11.8
  F.Cu w0.15: pad.RN03@170.713,8.103 172.695,8.103 172.72,8.128 172.72,8.077 v1(173.076,7.722) ; v1(175.92,10.516) 176.225,10.211 176.53,10.211 176.591,10.15 U5.2@177.387,10.15
  F.Cu w0.2: R2.1@170.675,9.4 170.675,8.141 pad.RN03@170.713,8.103 ; U5.2@177.387,10.15 177.538,10 J1.B5@179.595,10
  B.Cu w0.15: v1(173.076,7.722) 175.87,10.516 v1(175.92,10.516)
VBUS_5V: C1.1 D91.1 J1.A9 J1.B9 TP1.1 U3.1 U3.3 | length 24
  F.Cu w0.15: U3.3@175.75,13.475 175.755,13.475 177.597,11.633 177.597,11.024 177.6,11.02 J1.A9@179.595,11.02
  F.Cu w0.262: J1.A9@179.595,11.02 180.297,11.02
  F.Cu w0.35: U3.1@173.85,13.962 173.85,12.325 C1.1@174.225,11.95 175.75,13.475 U3.3@175.75,13.962 176.362,13.962 D91.1@178,15.6 178.35,15.6 ; J1.B9@179.595,7.98 v1(180.988,7.98) 180.988,10.381 180.349,11.02 180.297,11.02
  B.Cu w0.35: TP1.1@180.391,2.997 180.988,3.594 v1(180.988,7.98)
pads on no net: U1.1 U1.2 U1.3 U1.13 U1.14 U1.15 U1.16 U1.17 U1.18 U1.19 U1.20 U1.21 U1.22 U1.23 U1.26 U1.27 U1.28 U1.29 U1.32 U2. U2.12 U2.13 U2.14 U2.27 U2.28 U2.33 U2.37 U3.4 U4.1 U4.2 U4.5

## Polygon pours and split planes (outlines as drawn)
GND on B.Cu "B.Cu-GND" (solid, remove dead copper, pour order 0): 104,23 184.6,23 184.6,1 104,1

## Keep-outs
F.Cu:
  region: 137.2,32 134,32 134,38.5 137.2,38.5
  region: 134,24 104,24 104,50 134,50
B.Cu:
  region: 137.2,32 134,32 134,38.5 137.2,38.5
  region: 134,24 104,24 104,50 134,50
Edge.Cuts:
  the board outline again, w0.05

## Silkscreen, mask and mechanical layers (free items; w line width, h text height)
F.SilkS:
  text "01" at 174.85,49.825 h0.85
  text "S N A K E" at 142.85,49.75 h1
  text "ALEX" at 110.56,39.46 h2.2
  text "XU" at 110.36,34.76 h3.2
  text "Electrical Engineer" at 110.85,31.763 h0.85
  text "TAP / CONNECT" at 110.85,28.393 h0.8
  text "UP" at 115.166,22.325 h0.85
  text "5V" at 181.35,15.5 h0.9
  text "CLK" at 139.8,9.2 h0.8
  text "LEFT" at 107.132,7.125 h0.85
  text "RIGHT" at 121.798,7.125 h0.85
  text "START" at 131.053,7.125 h0.85
  text "DOWN" at 114.276,0.925 h0.85
B.SilkS:
  text "INTERACTIVE PCB CARD" at 181.4,49.05 h1.5
  text "Plug in. Press START." at 181.45,43.622 h1
  text "Play Snake." at 181.45,40.146 h1
  text "USB-C POWER / NFC CONTACT" at 181.45,22.798 h0.9
  text "EXAMPLE / SCAN TO CONNECT" at 127.45,17.864 h0.85
  text "DIO" at 137,12 h0.8
  text "REV C / AX-01" at 129.45,2.618 h0.85
  text "3V3" at 147.51,2.474 h0.8
  text "GND" at 149.291,0.95 h0.8
  text "RST" at 159.688,0.95 h0.8
  text "GND" at 175.25,0.95 h0.8
  text "3V3" at 179.266,0.95 h0.8
  text "5V" at 181.25,0.95 h0.8
Dwgs.User:
  lines w0.1: 104,24 134,24 134,50 104,50 104,24
  text "NFC: COIL ONLY / ALL LAYERS" at 103.85,50.893 h0.8

## Text inside footprints (layer, text, board x,y; h text height)
SW1: Cmts.User "No F.Cu tracks" at 117.47,18.17 h0.2; Cmts.User "KEEP-OUT ZONE" at 117.324,18.57 h0.2; Cmts.User "No F.Cu tracks" at 112.47,18.17 h0.2; Cmts.User "KEEP-OUT ZONE" at 112.324,18.57 h0.2
SW2: Cmts.User "KEEP-OUT ZONE" at 112.324,5.57 h0.2; Cmts.User "No F.Cu tracks" at 112.47,5.17 h0.2; Cmts.User "KEEP-OUT ZONE" at 117.324,5.57 h0.2; Cmts.User "No F.Cu tracks" at 117.47,5.17 h0.2
SW3: Cmts.User "No F.Cu tracks" at 109.97,11.67 h0.2; Cmts.User "KEEP-OUT ZONE" at 109.824,12.07 h0.2; Cmts.User "No F.Cu tracks" at 104.97,11.67 h0.2; Cmts.User "KEEP-OUT ZONE" at 104.824,12.07 h0.2
SW4: Cmts.User "No F.Cu tracks" at 124.97,11.67 h0.2; Cmts.User "KEEP-OUT ZONE" at 124.824,12.07 h0.2; Cmts.User "No F.Cu tracks" at 119.97,11.67 h0.2; Cmts.User "KEEP-OUT ZONE" at 119.824,12.07 h0.2
SW5: Cmts.User "KEEP-OUT ZONE" at 129.024,12.07 h0.2; Cmts.User "No F.Cu tracks" at 129.17,11.67 h0.2; Cmts.User "KEEP-OUT ZONE" at 134.024,12.07 h0.2; Cmts.User "No F.Cu tracks" at 134.17,11.67 h0.2